# Altium PCB Pod_Islands_Panel.PcbDoc (part 2 of 10)
Units mm, origin at the board's own origin, x right, y up, seen from the top; angles counter-clockwise.
Board outline 95.7 x 83.7 mm, 6 copper layers (Top Layer, Inner1, Inner2, Inner3, Inner4, Bottom Layer), stack 0.82 mm thick; 1100 components, 940 nets, 4944 pads, 3680 vias.
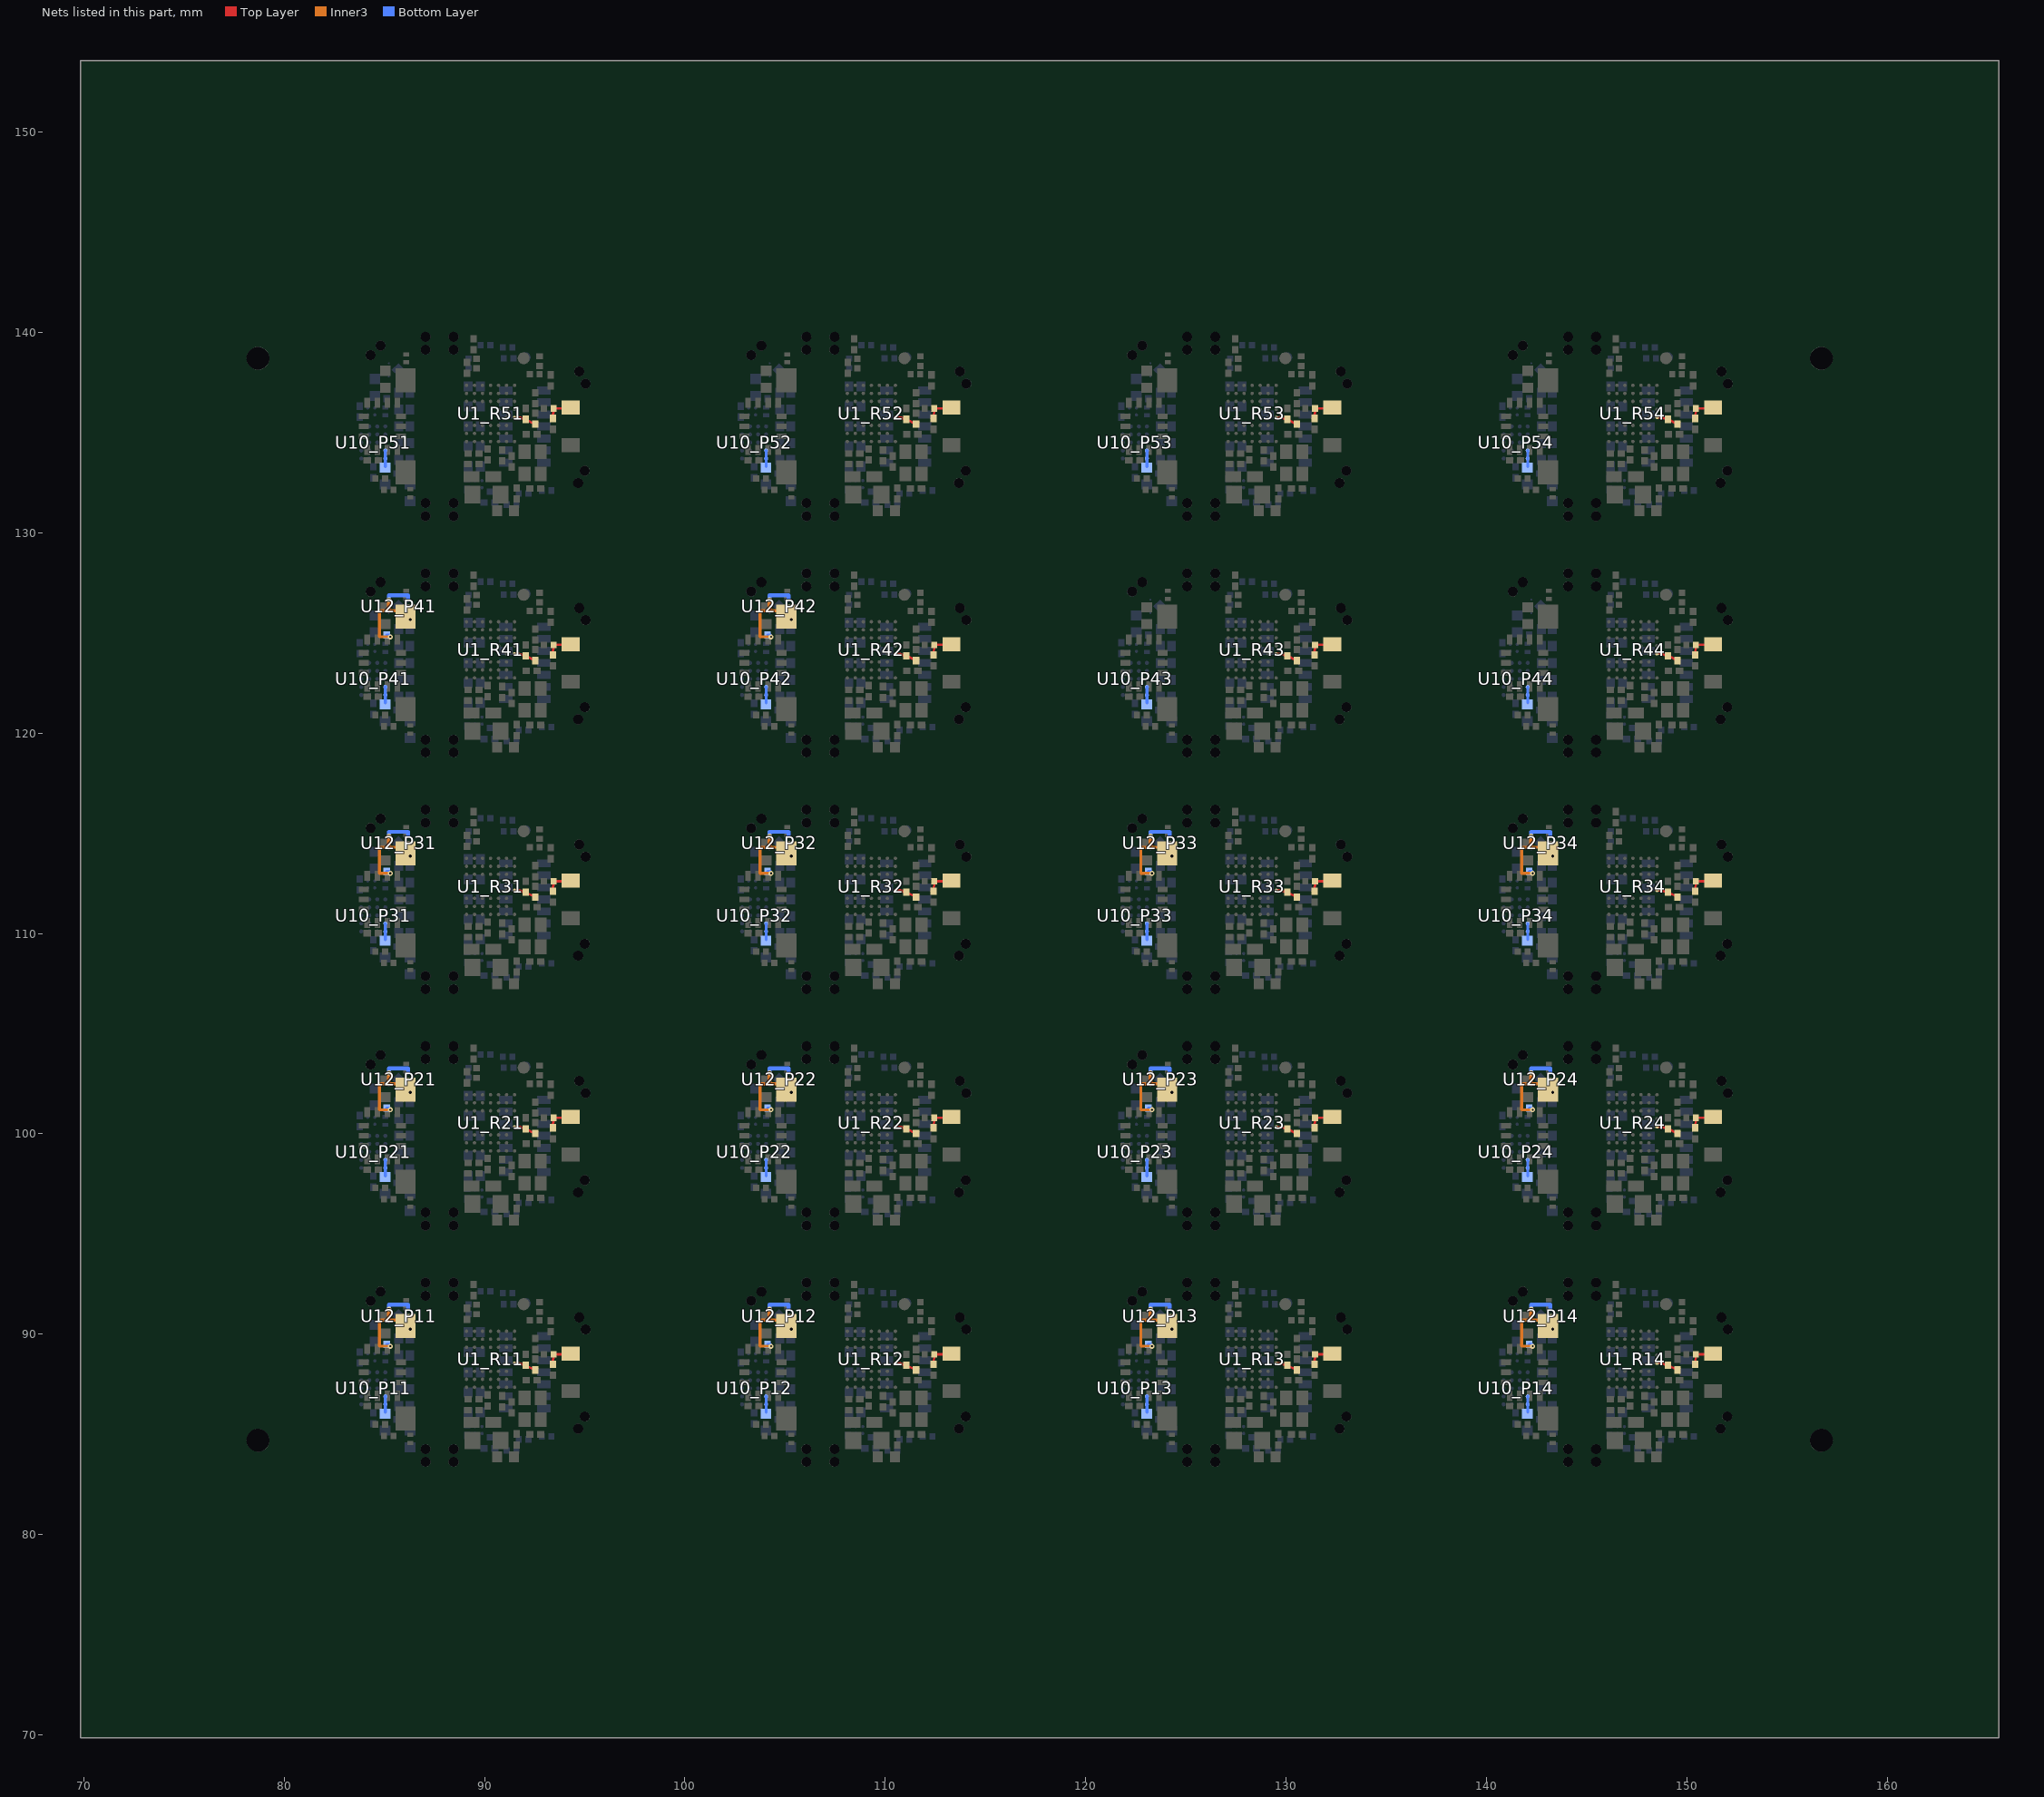
[diagram p6: the nets of this part, all layers, seen from the top]

## Components (designator, comment, footprint, x,y, rotation, side; value= is the part's Value field where it differs from the comment) (continued)
U1_R54 "NRF52832-CIAA-G-R7" WLCSP-50_L3.2-W3.0-TL_NRF52832 147.3,135.95 r180 top
U2_R11 "TPS7A0218PYCHR" WLCSP-4_L0.6-W0.6-P0.35-R2-C2-TL 89.7,85.22 r180 bottom
U2_R12 "TPS7A0218PYCHR" WLCSP-4_L0.6-W0.6-P0.35-R2-C2-TL 108.7,85.22 r180 bottom
U2_R13 "TPS7A0218PYCHR" WLCSP-4_L0.6-W0.6-P0.35-R2-C2-TL 127.7,85.22 r180 bottom
U2_R14 "TPS7A0218PYCHR" WLCSP-4_L0.6-W0.6-P0.35-R2-C2-TL 146.7,85.22 r180 bottom
U2_R21 "TPS7A0218PYCHR" WLCSP-4_L0.6-W0.6-P0.35-R2-C2-TL 89.7,97.02 r180 bottom
U2_R22 "TPS7A0218PYCHR" WLCSP-4_L0.6-W0.6-P0.35-R2-C2-TL 108.7,97.02 r180 bottom
U2_R23 "TPS7A0218PYCHR" WLCSP-4_L0.6-W0.6-P0.35-R2-C2-TL 127.7,97.02 r180 bottom
U2_R24 "TPS7A0218PYCHR" WLCSP-4_L0.6-W0.6-P0.35-R2-C2-TL 146.7,97.02 r180 bottom
U2_R31 "TPS7A0218PYCHR" WLCSP-4_L0.6-W0.6-P0.35-R2-C2-TL 89.7,108.82 r180 bottom
U2_R32 "TPS7A0218PYCHR" WLCSP-4_L0.6-W0.6-P0.35-R2-C2-TL 108.7,108.82 r180 bottom
U2_R33 "TPS7A0218PYCHR" WLCSP-4_L0.6-W0.6-P0.35-R2-C2-TL 127.7,108.82 r180 bottom
U2_R34 "TPS7A0218PYCHR" WLCSP-4_L0.6-W0.6-P0.35-R2-C2-TL 146.7,108.82 r180 bottom
U2_R41 "TPS7A0218PYCHR" WLCSP-4_L0.6-W0.6-P0.35-R2-C2-TL 89.7,120.62 r180 bottom
U2_R42 "TPS7A0218PYCHR" WLCSP-4_L0.6-W0.6-P0.35-R2-C2-TL 108.7,120.62 r180 bottom
U2_R43 "TPS7A0218PYCHR" WLCSP-4_L0.6-W0.6-P0.35-R2-C2-TL 127.7,120.62 r180 bottom
U2_R44 "TPS7A0218PYCHR" WLCSP-4_L0.6-W0.6-P0.35-R2-C2-TL 146.7,120.62 r180 bottom
U2_R51 "TPS7A0218PYCHR" WLCSP-4_L0.6-W0.6-P0.35-R2-C2-TL 89.7,132.42 r180 bottom
U2_R52 "TPS7A0218PYCHR" WLCSP-4_L0.6-W0.6-P0.35-R2-C2-TL 108.7,132.42 r180 bottom
U2_R53 "TPS7A0218PYCHR" WLCSP-4_L0.6-W0.6-P0.35-R2-C2-TL 127.7,132.42 r180 bottom
U2_R54 "TPS7A0218PYCHR" WLCSP-4_L0.6-W0.6-P0.35-R2-C2-TL 146.7,132.42 r180 bottom
U3_R11 "MAXM86161AEFD+T" OLGA-14_L4.3-W2.9-P0.60-TL 92.01,88.1 r180 bottom
U3_R12 "MAXM86161AEFD+T" OLGA-14_L4.3-W2.9-P0.60-TL 111.01,88.1 r180 bottom
U3_R13 "MAXM86161AEFD+T" OLGA-14_L4.3-W2.9-P0.60-TL 130.01,88.1 r180 bottom
U3_R14 "MAXM86161AEFD+T" OLGA-14_L4.3-W2.9-P0.60-TL 149.01,88.1 r180 bottom
U3_R21 "MAXM86161AEFD+T" OLGA-14_L4.3-W2.9-P0.60-TL 92.01,99.9 r180 bottom
U3_R22 "MAXM86161AEFD+T" OLGA-14_L4.3-W2.9-P0.60-TL 111.01,99.9 r180 bottom
U3_R23 "MAXM86161AEFD+T" OLGA-14_L4.3-W2.9-P0.60-TL 130.01,99.9 r180 bottom
U3_R24 "MAXM86161AEFD+T" OLGA-14_L4.3-W2.9-P0.60-TL 149.01,99.9 r180 bottom
U3_R31 "MAXM86161AEFD+T" OLGA-14_L4.3-W2.9-P0.60-TL 92.01,111.7 r180 bottom
U3_R32 "MAXM86161AEFD+T" OLGA-14_L4.3-W2.9-P0.60-TL 111.01,111.7 r180 bottom
U3_R33 "MAXM86161AEFD+T" OLGA-14_L4.3-W2.9-P0.60-TL 130.01,111.7 r180 bottom
U3_R34 "MAXM86161AEFD+T" OLGA-14_L4.3-W2.9-P0.60-TL 149.01,111.7 r180 bottom
U3_R41 "MAXM86161AEFD+T" OLGA-14_L4.3-W2.9-P0.60-TL 92.01,123.5 r180 bottom
U3_R42 "MAXM86161AEFD+T" OLGA-14_L4.3-W2.9-P0.60-TL 111.01,123.5 r180 bottom
U3_R43 "MAXM86161AEFD+T" OLGA-14_L4.3-W2.9-P0.60-TL 130.01,123.5 r180 bottom
U3_R44 "MAXM86161AEFD+T" OLGA-14_L4.3-W2.9-P0.60-TL 149.01,123.5 r180 bottom
U3_R51 "MAXM86161AEFD+T" OLGA-14_L4.3-W2.9-P0.60-TL 92.01,135.3 r180 bottom
U3_R52 "MAXM86161AEFD+T" OLGA-14_L4.3-W2.9-P0.60-TL 111.01,135.3 r180 bottom
U3_R53 "MAXM86161AEFD+T" OLGA-14_L4.3-W2.9-P0.60-TL 130.01,135.3 r180 bottom
U3_R54 "MAXM86161AEFD+T" OLGA-14_L4.3-W2.9-P0.60-TL 149.01,135.3 r180 bottom
U10_P11 "BQ21061YFPR" DSBGA-20_L2.0-W1.6-R4-C5-P0.40-BL-1 84.45,87.3 r270 bottom
U10_P12 "BQ21061YFPR" DSBGA-20_L2.0-W1.6-R4-C5-P0.40-BL-1 103.45,87.3 r270 bottom
U10_P13 "BQ21061YFPR" DSBGA-20_L2.0-W1.6-R4-C5-P0.40-BL-1 122.45,87.3 r270 bottom
U10_P14 "BQ21061YFPR" DSBGA-20_L2.0-W1.6-R4-C5-P0.40-BL-1 141.45,87.3 r270 bottom
U10_P21 "BQ21061YFPR" DSBGA-20_L2.0-W1.6-R4-C5-P0.40-BL-1 84.45,99.1 r270 bottom
U10_P22 "BQ21061YFPR" DSBGA-20_L2.0-W1.6-R4-C5-P0.40-BL-1 103.45,99.1 r270 bottom
U10_P23 "BQ21061YFPR" DSBGA-20_L2.0-W1.6-R4-C5-P0.40-BL-1 122.45,99.1 r270 bottom
U10_P24 "BQ21061YFPR" DSBGA-20_L2.0-W1.6-R4-C5-P0.40-BL-1 141.45,99.1 r270 bottom
U10_P31 "BQ21061YFPR" DSBGA-20_L2.0-W1.6-R4-C5-P0.40-BL-1 84.45,110.9 r270 bottom
U10_P32 "BQ21061YFPR" DSBGA-20_L2.0-W1.6-R4-C5-P0.40-BL-1 103.45,110.9 r270 bottom
U10_P33 "BQ21061YFPR" DSBGA-20_L2.0-W1.6-R4-C5-P0.40-BL-1 122.45,110.9 r270 bottom
U10_P34 "BQ21061YFPR" DSBGA-20_L2.0-W1.6-R4-C5-P0.40-BL-1 141.45,110.9 r270 bottom
U10_P41 "BQ21061YFPR" DSBGA-20_L2.0-W1.6-R4-C5-P0.40-BL-1 84.45,122.7 r270 bottom
U10_P42 "BQ21061YFPR" DSBGA-20_L2.0-W1.6-R4-C5-P0.40-BL-1 103.45,122.7 r270 bottom
U10_P43 "BQ21061YFPR" DSBGA-20_L2.0-W1.6-R4-C5-P0.40-BL-1 122.45,122.7 r270 bottom
U10_P44 "BQ21061YFPR" DSBGA-20_L2.0-W1.6-R4-C5-P0.40-BL-1 141.45,122.7 r270 bottom
U10_P51 "BQ21061YFPR" DSBGA-20_L2.0-W1.6-R4-C5-P0.40-BL-1 84.45,134.5 r270 bottom
U10_P52 "BQ21061YFPR" DSBGA-20_L2.0-W1.6-R4-C5-P0.40-BL-1 103.45,134.5 r270 bottom
U10_P53 "BQ21061YFPR" DSBGA-20_L2.0-W1.6-R4-C5-P0.40-BL-1 122.45,134.5 r270 bottom
U10_P54 "BQ21061YFPR" DSBGA-20_L2.0-W1.6-R4-C5-P0.40-BL-1 141.45,134.5 r270 bottom
U11_P11 "LSM6DSV16BXTR" LGA-14L_L3.0-W2.5-P0.50-TL 84.9,88.1 r270 top
U11_P12 "LSM6DSV16BXTR" LGA-14L_L3.0-W2.5-P0.50-TL 103.9,88.1 r270 top
U11_P13 "LSM6DSV16BXTR" LGA-14L_L3.0-W2.5-P0.50-TL 122.9,88.1 r270 top
U11_P14 "LSM6DSV16BXTR" LGA-14L_L3.0-W2.5-P0.50-TL 141.9,88.1 r270 top
U11_P21 "LSM6DSV16BXTR" LGA-14L_L3.0-W2.5-P0.50-TL 84.9,99.9 r270 top
U11_P22 "LSM6DSV16BXTR" LGA-14L_L3.0-W2.5-P0.50-TL 103.9,99.9 r270 top
U11_P23 "LSM6DSV16BXTR" LGA-14L_L3.0-W2.5-P0.50-TL 122.9,99.9 r270 top
U11_P24 "LSM6DSV16BXTR" LGA-14L_L3.0-W2.5-P0.50-TL 141.9,99.9 r270 top
U11_P31 "LSM6DSV16BXTR" LGA-14L_L3.0-W2.5-P0.50-TL 84.9,111.7 r270 top
U11_P32 "LSM6DSV16BXTR" LGA-14L_L3.0-W2.5-P0.50-TL 103.9,111.7 r270 top
U11_P33 "LSM6DSV16BXTR" LGA-14L_L3.0-W2.5-P0.50-TL 122.9,111.7 r270 top
U11_P34 "LSM6DSV16BXTR" LGA-14L_L3.0-W2.5-P0.50-TL 141.9,111.7 r270 top
U11_P41 "LSM6DSV16BXTR" LGA-14L_L3.0-W2.5-P0.50-TL 84.9,123.5 r270 top
U11_P42 "LSM6DSV16BXTR" LGA-14L_L3.0-W2.5-P0.50-TL 103.9,123.5 r270 top
U11_P43 "LSM6DSV16BXTR" LGA-14L_L3.0-W2.5-P0.50-TL 122.9,123.5 r270 top
U11_P44 "LSM6DSV16BXTR" LGA-14L_L3.0-W2.5-P0.50-TL 141.9,123.5 r270 top
U11_P51 "LSM6DSV16BXTR" LGA-14L_L3.0-W2.5-P0.50-TL 84.9,135.3 r270 top
U11_P52 "LSM6DSV16BXTR" LGA-14L_L3.0-W2.5-P0.50-TL 103.9,135.3 r270 top
U11_P53 "LSM6DSV16BXTR" LGA-14L_L3.0-W2.5-P0.50-TL 122.9,135.3 r270 top
U11_P54 "LSM6DSV16BXTR" LGA-14L_L3.0-W2.5-P0.50-TL 141.9,135.3 r270 top
U12_P11 "AP6683" DFN-4_L1.0-W1.0-P0.65-BL-EP 85.7,90.92 r90 bottom
U12_P12 "AP6683" DFN-4_L1.0-W1.0-P0.65-BL-EP 104.7,90.92 r90 bottom
U12_P13 "AP6683" DFN-4_L1.0-W1.0-P0.65-BL-EP 123.7,90.92 r90 bottom
U12_P14 "AP6683" DFN-4_L1.0-W1.0-P0.65-BL-EP 142.7,90.92 r90 bottom
U12_P21 "AP6683" DFN-4_L1.0-W1.0-P0.65-BL-EP 85.7,102.72 r90 bottom
U12_P22 "AP6683" DFN-4_L1.0-W1.0-P0.65-BL-EP 104.7,102.72 r90 bottom
U12_P23 "AP6683" DFN-4_L1.0-W1.0-P0.65-BL-EP 123.7,102.72 r90 bottom
U12_P24 "AP6683" DFN-4_L1.0-W1.0-P0.65-BL-EP 142.7,102.72 r90 bottom
U12_P31 "AP6683" DFN-4_L1.0-W1.0-P0.65-BL-EP 85.7,114.52 r90 bottom
U12_P32 "AP6683" DFN-4_L1.0-W1.0-P0.65-BL-EP 104.7,114.52 r90 bottom
U12_P33 "AP6683" DFN-4_L1.0-W1.0-P0.65-BL-EP 123.7,114.52 r90 bottom
U12_P34 "AP6683" DFN-4_L1.0-W1.0-P0.65-BL-EP 142.7,114.52 r90 bottom
U12_P41 "AP6683" DFN-4_L1.0-W1.0-P0.65-BL-EP 85.7,126.32 r90 bottom
U12_P42 "AP6683" DFN-4_L1.0-W1.0-P0.65-BL-EP 104.7,126.32 r90 bottom
U12_P43 "AP6683" DFN-4_L1.0-W1.0-P0.65-BL-EP 123.7,126.32 r90 bottom
U12_P44 "AP6683" DFN-4_L1.0-W1.0-P0.65-BL-EP 142.7,126.32 r90 bottom
U12_P51 "AP6683" DFN-4_L1.0-W1.0-P0.65-BL-EP 85.7,138.12 r90 bottom
U12_P52 "AP6683" DFN-4_L1.0-W1.0-P0.65-BL-EP 104.7,138.12 r90 bottom
U12_P53 "AP6683" DFN-4_L1.0-W1.0-P0.65-BL-EP 123.7,138.12 r90 bottom
U12_P54 "AP6683" DFN-4_L1.0-W1.0-P0.65-BL-EP 142.7,138.12 r90 bottom
U13_P11 "TPS7A0218PYCHR" WLCSP-4_L0.6-W0.6-P0.35-R2-C2-TL 84.35,88.85 r180 bottom
U13_P12 "TPS7A0218PYCHR" WLCSP-4_L0.6-W0.6-P0.35-R2-C2-TL 103.35,88.85 r180 bottom
U13_P13 "TPS7A0218PYCHR" WLCSP-4_L0.6-W0.6-P0.35-R2-C2-TL 122.35,88.85 r180 bottom
U13_P14 "TPS7A0218PYCHR" WLCSP-4_L0.6-W0.6-P0.35-R2-C2-TL 141.35,88.85 r180 bottom
U13_P21 "TPS7A0218PYCHR" WLCSP-4_L0.6-W0.6-P0.35-R2-C2-TL 84.35,100.65 r180 bottom
U13_P22 "TPS7A0218PYCHR" WLCSP-4_L0.6-W0.6-P0.35-R2-C2-TL 103.35,100.65 r180 bottom
U13_P23 "TPS7A0218PYCHR" WLCSP-4_L0.6-W0.6-P0.35-R2-C2-TL 122.35,100.65 r180 bottom
U13_P24 "TPS7A0218PYCHR" WLCSP-4_L0.6-W0.6-P0.35-R2-C2-TL 141.35,100.65 r180 bottom
U13_P31 "TPS7A0218PYCHR" WLCSP-4_L0.6-W0.6-P0.35-R2-C2-TL 84.35,112.45 r180 bottom
U13_P32 "TPS7A0218PYCHR" WLCSP-4_L0.6-W0.6-P0.35-R2-C2-TL 103.35,112.45 r180 bottom
U13_P33 "TPS7A0218PYCHR" WLCSP-4_L0.6-W0.6-P0.35-R2-C2-TL 122.35,112.45 r180 bottom
U13_P34 "TPS7A0218PYCHR" WLCSP-4_L0.6-W0.6-P0.35-R2-C2-TL 141.35,112.45 r180 bottom
U13_P41 "TPS7A0218PYCHR" WLCSP-4_L0.6-W0.6-P0.35-R2-C2-TL 84.35,124.25 r180 bottom
U13_P42 "TPS7A0218PYCHR" WLCSP-4_L0.6-W0.6-P0.35-R2-C2-TL 103.35,124.25 r180 bottom
U13_P43 "TPS7A0218PYCHR" WLCSP-4_L0.6-W0.6-P0.35-R2-C2-TL 122.35,124.25 r180 bottom
U13_P44 "TPS7A0218PYCHR" WLCSP-4_L0.6-W0.6-P0.35-R2-C2-TL 141.35,124.25 r180 bottom
U13_P51 "TPS7A0218PYCHR" WLCSP-4_L0.6-W0.6-P0.35-R2-C2-TL 84.35,136.05 r180 bottom
U13_P52 "TPS7A0218PYCHR" WLCSP-4_L0.6-W0.6-P0.35-R2-C2-TL 103.35,136.05 r180 bottom
U13_P53 "TPS7A0218PYCHR" WLCSP-4_L0.6-W0.6-P0.35-R2-C2-TL 122.35,136.05 r180 bottom
U13_P54 "TPS7A0218PYCHR" WLCSP-4_L0.6-W0.6-P0.35-R2-C2-TL 141.35,136.05 r180 bottom
Y1_R11 "-" CRYSTAL-SMD_4P-L1.6-W1.2-BL 92.4,86.28 r90 top
Y1_R12 "-" CRYSTAL-SMD_4P-L1.6-W1.2-BL 111.4,86.28 r90 top
Y1_R13 "-" CRYSTAL-SMD_4P-L1.6-W1.2-BL 130.4,86.28 r90 top
Y1_R14 "-" CRYSTAL-SMD_4P-L1.6-W1.2-BL 149.4,86.28 r90 top
Y1_R21 "-" CRYSTAL-SMD_4P-L1.6-W1.2-BL 92.4,98.08 r90 top
Y1_R22 "-" CRYSTAL-SMD_4P-L1.6-W1.2-BL 111.4,98.08 r90 top
Y1_R23 "-" CRYSTAL-SMD_4P-L1.6-W1.2-BL 130.4,98.08 r90 top
Y1_R24 "-" CRYSTAL-SMD_4P-L1.6-W1.2-BL 149.4,98.08 r90 top
Y1_R31 "-" CRYSTAL-SMD_4P-L1.6-W1.2-BL 92.4,109.88 r90 top
Y1_R32 "-" CRYSTAL-SMD_4P-L1.6-W1.2-BL 111.4,109.88 r90 top
Y1_R33 "-" CRYSTAL-SMD_4P-L1.6-W1.2-BL 130.4,109.88 r90 top
Y1_R34 "-" CRYSTAL-SMD_4P-L1.6-W1.2-BL 149.4,109.88 r90 top
Y1_R41 "-" CRYSTAL-SMD_4P-L1.6-W1.2-BL 92.4,121.68 r90 top
Y1_R42 "-" CRYSTAL-SMD_4P-L1.6-W1.2-BL 111.4,121.68 r90 top
Y1_R43 "-" CRYSTAL-SMD_4P-L1.6-W1.2-BL 130.4,121.68 r90 top
Y1_R44 "-" CRYSTAL-SMD_4P-L1.6-W1.2-BL 149.4,121.68 r90 top
Y1_R51 "-" CRYSTAL-SMD_4P-L1.6-W1.2-BL 92.4,133.48 r90 top
Y1_R52 "-" CRYSTAL-SMD_4P-L1.6-W1.2-BL 111.4,133.48 r90 top
Y1_R53 "-" CRYSTAL-SMD_4P-L1.6-W1.2-BL 130.4,133.48 r90 top
Y1_R54 "-" CRYSTAL-SMD_4P-L1.6-W1.2-BL 149.4,133.48 r90 top
Z41_R11 "0Ω" R0201 93.2,89 r0 top
Z41_R12 "0Ω" R0201 112.2,89 r0 top
Z41_R13 "0Ω" R0201 131.2,89 r0 top
Z41_R14 "0Ω" R0201 150.2,89 r0 top
Z41_R21 "0Ω" R0201 93.2,100.8 r0 top
Z41_R22 "0Ω" R0201 112.2,100.8 r0 top
Z41_R23 "0Ω" R0201 131.2,100.8 r0 top
Z41_R24 "0Ω" R0201 150.2,100.8 r0 top
Z41_R31 "0Ω" R0201 93.2,112.6 r0 top
Z41_R32 "0Ω" R0201 112.2,112.6 r0 top
Z41_R33 "0Ω" R0201 131.2,112.6 r0 top
Z41_R34 "0Ω" R0201 150.2,112.6 r0 top
Z41_R41 "0Ω" R0201 93.2,124.4 r0 top
Z41_R42 "0Ω" R0201 112.2,124.4 r0 top
Z41_R43 "0Ω" R0201 131.2,124.4 r0 top
Z41_R44 "0Ω" R0201 150.2,124.4 r0 top
Z41_R51 "0Ω" R0201 93.2,136.2 r0 top
Z41_R52 "0Ω" R0201 112.2,136.2 r0 top
Z41_R53 "0Ω" R0201 131.2,136.2 r0 top
Z41_R54 "0Ω" R0201 150.2,136.2 r0 top

## Footprints (in the part's own frame and the unit in brackets; to place one, negate y for a bottom-side part, rotate by r counter-clockwise, add the part's x,y. Pads: shape width x height; smd on the part's side, far side on the other; paste and mask are expansions set on the pad)
ANT-SMD_L1.7-W0.9 [mm]
  rect 0.7x0.9 smd paste+0 mask+0.051: 1(-0.937,0) 2(0.937,0)
  silkscreen extent 1.4,-0.1 1.6,0.1
C0201 [mm]
  rect 0.368x0.324 smd paste-100 mask+0.051: 1(-0.274,0) 2(0.274,0)
C0402 [mm]
  rect 0.5x0.54 smd paste+0 mask+0.051: 1(-0.42,0) 2(0.42,0)
CRYSTAL-SMD_4P-L1.6-W1.2-BL [mm]
  rect 0.73x0.6 smd paste+0 mask+0.05: 1(-0.55,-0.4) 2(0.55,-0.4) 3(0.55,0.4) 4(-0.55,0.4)
  silkscreen extent -1.27,-1.05 -1.07,-0.85
DFN-4_L1.0-W1.0-P0.65-BL-EP [mm]
  round 0.092 smd: 1(-0.333,-0.475) 2(0.333,-0.474) 3(0.333,0.475) 4(-0.333,0.475)
  rect 0.48x0.48 smd rot 45: 5(0.004,0.001)
  Top Layer region: 0.425,-0.649 0.225,-0.649 0.225,-0.399 0.225,-0.399 0.375,-0.249 0.425,-0.249
  Top Layer region: -0.225,-0.4 -0.225,-0.65 -0.425,-0.65 -0.425,-0.25 -0.375,-0.25
  Top Layer region: -0.425,0.651 -0.225,0.651 -0.225,0.401 -0.225,0.401 -0.375,0.251 -0.425,0.251
  Top Layer region: 0.425,0.651 0.225,0.651 0.225,0.401 0.225,0.401 0.375,0.251 0.425,0.251
  silkscreen extent -0.78,-1.06 -0.58,-0.85
DSBGA-20_L2.0-W1.6-R4-C5-P0.40-BL-1 [mm]
  round 0.2 smd paste-100 mask+0.051: A1(-0.8,-0.6) A2(-0.8,-0.2) A3(-0.8,0.2) A4(-0.8,0.6) B1(-0.4,-0.6) B2(-0.4,-0.2) B3(-0.4,0.2) B4(-0.4,0.6) C1(0,-0.6) C2(0,-0.2) C3(0,0.2) C4(0,0.6) D1(0.4,-0.6) D2(0.4,-0.2) D3(0.4,0.2) D4(0.4,0.6) E1(0.8,-0.6) E2(0.8,-0.2) E3(0.8,0.2) E4(0.8,0.6)
  silkscreen extent -1.26,-1.06 -1.05,-0.85
L0201-RD [mm]
  rect 0.368x0.324 smd paste-100 mask+0.051: 1(-0.274,0) 2(0.274,0)
L0402-R-RD [mm]
  rect 0.79x0.54 smd paste-100 mask+0.051: 1(-0.545,0) 2(0.545,0)
L0603 [mm]
  rect 0.8x0.864 smd paste-100 mask+0.051: 1(-0.7,0) 2(0.7,0)
LGA-14L_L3.0-W2.5-P0.50-TL [mm]
  rect 0.5x0.28 smd: 1(-1.175,0.75) 2(-1.175,0.25) 3(-1.175,-0.25) 4(-1.175,-0.75) 8(1.175,-0.75) 9(1.175,-0.25) 10(1.175,0.25) 11(1.175,0.75)
  rect 0.28x0.5 smd: 5(-0.5,-0.925) 6(0,-0.925) 7(0.5,-0.925) 12(0.5,0.925) 13(0,0.925) 14(-0.5,0.925)
  silkscreen extent -1.78,1.22 -1.58,1.42
OLGA-14_L4.3-W2.9-P0.60-TL [mm]
  rect 0.66x0.4 smd: 1(-0.95,1.8) 2(-0.95,1.2) 3(-0.95,0.6) 4(-0.95,0) 5(-0.95,-0.6) 6(-0.95,-1.2) 7(-0.95,-1.8) 8(0.95,-1.8) 9(0.95,-1.2) 10(0.95,-0.6) 11(0.95,0) 12(0.95,0.6) 13(0.95,1.2) 14(0.95,1.8)
  silkscreen extent -1.64,2.15 -1.43,2.36
R0201 [mm]
  rect 0.303x0.324 smd paste-100 mask+0.051: 1(-0.242,0) 2(0.242,0)
WLCSP-4_L0.6-W0.6-P0.35-R2-C2-TL [mm]
  round 0.158 smd paste-100 mask+0.05: A1(-0.175,0.175) A2(0.175,0.175) B1(-0.175,-0.175) B2(0.175,-0.175)
  silkscreen extent -0.61,0.41 -0.41,0.61
WLCSP-50_L3.2-W3.0-TL_NRF52832 [mm]
  round 0.17 smd paste-100 mask+0.051: A1(-1.2,1.4) A2(-0.8,1.4) A3(-0.4,1.4) A4(0,1.4) A5(0.4,1.4) A6(0.8,1.4) A7(1.2,1.4) B2(-0.8,1) B3(-0.4,1) B4(0,1) B5(0.4,1) B6(0.8,1) B7(1.2,1) C2(-0.8,0.6) C3(-0.4,0.6) C4(0,0.6) C5(0.4,0.6) C6(0.8,0.6) C7(1.2,0.6) D1(-1.2,0.2) D2(-0.8,0.2) D3(-0.4,0.2) D6(0.8,0.2) D7(1.2,0.2) E1(-1.2,-0.2) E2(-0.8,-0.2) E3(-0.4,-0.2) E6(0.8,-0.2) E7(1.2,-0.2) F1(-1.2,-0.6) F2(-0.8,-0.6) F3(-0.4,-0.6) F4(0,-0.6) F5(0.4,-0.6) F6(0.8,-0.6) F7(1.2,-0.6) G1(-1.2,-1) G2(-0.8,-1) G3(-0.4,-1) G4(0,-1) G5(0.4,-1) G6(0.8,-1) G7(1.2,-1) H1(-1.2,-1.4) H2(-0.8,-1.4) H3(-0.4,-1.4) H4(0,-1.4) H5(0.4,-1.4) H6(0.8,-1.4) H7(1.2,-1.4)
  silkscreen extent -1.64,1.64 -1.44,1.84
X3-DFN0603-2_L0.6-W0.3-RD [mm]
  rect 0.2x0.3 smd: 1(-0.2,0) 2(0.2,0)
  silkscreen extent -0.66,-0.1 -0.45,0.1

## Free pads (board coordinates)
  rect 1.001x1.199 smd paste+0 mask+0.051: BT1(86.058,85.8) BT1(86.058,97.601) BT1(86.058,109.4) BT1(86.058,121.2) BT1(86.058,133.001) BT1(105.06,85.8) BT1(105.06,97.601) BT1(105.06,109.4) BT1(105.06,121.2) BT1(105.06,133.001) BT1(124.059,85.8) BT1(124.059,97.601) BT1(124.059,109.4) BT1(124.059,121.2) BT1(124.059,133.001) BT1(143.058,85.8) BT1(143.058,97.601) BT1(143.058,109.4) BT1(143.058,121.2) BT1(143.058,133.001) BT2(86.058,90.4) BT2(86.058,102.201) BT2(86.058,113.999) BT2(86.058,125.8) BT2(86.058,137.601) BT2(105.06,90.4) BT2(105.06,102.201) BT2(105.06,113.999) BT2(105.06,125.8) BT2(105.06,137.601) BT2(124.059,90.4) BT2(124.059,102.201) BT2(124.059,113.999) BT2(124.059,125.8) BT2(124.059,137.601) BT2(143.058,90.4) BT2(143.058,102.201) BT2(143.058,113.999) BT2(143.058,125.8) BT2(143.058,137.601)
  rect 0.45x0.5 smd far side paste+0 mask+0: JP1(86.274,86.42) JP1(86.274,98.221) JP1(86.274,110.019) JP1(86.274,121.82) JP1(86.274,133.621) JP1(105.276,86.42) JP1(105.276,98.221) JP1(105.276,110.019) JP1(105.276,121.82) JP1(105.276,133.621) JP1(124.275,86.42) JP1(124.275,98.221) JP1(124.275,110.019) JP1(124.275,121.82) JP1(124.275,133.621) JP1(143.274,86.42) JP1(143.274,98.221) JP1(143.274,110.019) JP1(143.274,121.82) JP1(143.274,133.621) JP2(86.274,87.261) JP2(86.274,99.062) JP2(86.274,110.86) JP2(86.274,122.661) JP2(86.274,134.462) JP2(105.276,87.261) JP2(105.276,99.062) JP2(105.276,110.86) JP2(105.276,122.661) JP2(105.276,134.462) JP2(124.275,87.261) JP2(124.275,99.062) JP2(124.275,110.86) JP2(124.275,122.661) JP2(124.275,134.462) JP2(143.274,87.261) JP2(143.274,99.062) JP2(143.274,110.86) JP2(143.274,122.661) JP2(143.274,134.462) JP3(86.274,88.099) JP3(86.274,99.9) JP3(86.274,111.698) JP3(86.274,123.499) JP3(86.274,135.3) JP3(105.276,88.099) JP3(105.276,99.9) JP3(105.276,111.698) JP3(105.276,123.499) JP3(105.276,135.3) JP3(124.275,88.099) JP3(124.275,99.9) JP3(124.275,111.698) JP3(124.275,123.499) JP3(124.275,135.3) JP3(143.274,88.099) JP3(143.274,99.9) JP3(143.274,111.698) JP3(143.274,123.499) JP3(143.274,135.3) JP4(86.274,88.94) JP4(86.274,100.741) JP4(86.274,112.539) JP4(86.274,124.34) JP4(86.274,136.141) JP4(105.276,88.94) JP4(105.276,100.741) JP4(105.276,112.539) JP4(105.276,124.34) JP4(105.276,136.141) JP4(124.275,88.94) JP4(124.275,100.741) JP4(124.275,112.539) JP4(124.275,124.34) JP4(124.275,136.141) JP4(143.274,88.94) JP4(143.274,100.741) JP4(143.274,112.539) JP4(143.274,124.34) JP4(143.274,136.141) JP5(86.274,89.781) JP5(86.274,101.581) JP5(86.274,113.38) JP5(86.274,125.181) JP5(86.274,136.981) JP5(105.276,89.781) JP5(105.276,101.581) JP5(105.276,113.38) JP5(105.276,125.181) JP5(105.276,136.981) JP5(124.275,89.781) JP5(124.275,101.581) JP5(124.275,113.38) JP5(124.275,125.181) JP5(124.275,136.981) JP5(143.274,89.781) JP5(143.274,101.581) JP5(143.274,113.38) JP5(143.274,125.181) JP5(143.274,136.981) JP6(85.723,86.42) JP6(85.723,98.221) JP6(85.723,110.019) JP6(85.723,121.82) JP6(85.723,133.621) JP6(104.725,86.42) JP6(104.725,98.221) JP6(104.725,110.019) JP6(104.725,121.82) JP6(104.725,133.621) JP6(123.724,86.42) JP6(123.724,98.221) JP6(123.724,110.019) JP6(123.724,121.82) JP6(123.724,133.621) JP6(142.723,86.42) JP6(142.723,98.221) JP6(142.723,110.019) JP6(142.723,121.82) JP6(142.723,133.621) JP7(85.723,87.261) JP7(85.723,99.062) JP7(85.723,110.86) JP7(85.723,122.661) JP7(85.723,134.462) JP7(104.725,87.261) JP7(104.725,99.062) JP7(104.725,110.86) JP7(104.725,122.661) JP7(104.725,134.462) JP7(123.724,87.261) JP7(123.724,99.062) JP7(123.724,110.86) JP7(123.724,122.661) JP7(123.724,134.462) JP7(142.723,87.261) JP7(142.723,99.062) JP7(142.723,110.86) JP7(142.723,122.661) JP7(142.723,134.462) JP8(85.723,88.099) JP8(85.723,99.9) JP8(85.723,111.698) JP8(85.723,123.499) JP8(85.723,135.3) JP8(104.725,88.099) JP8(104.725,99.9) JP8(104.725,111.698) JP8(104.725,123.499) JP8(104.725,135.3) JP8(123.724,88.099) JP8(123.724,99.9) JP8(123.724,111.698) JP8(123.724,123.499) JP8(123.724,135.3) JP8(142.723,88.099) JP8(142.723,99.9) JP8(142.723,111.698) JP8(142.723,123.499) JP8(142.723,135.3) JP9(85.723,88.94) JP9(85.723,100.741) JP9(85.723,112.539) JP9(85.723,124.34) JP9(85.723,136.141) JP9(104.725,88.94) JP9(104.725,100.741) JP9(104.725,112.539) JP9(104.725,124.34) JP9(104.725,136.141) JP9(123.724,88.94) JP9(123.724,100.741) JP9(123.724,112.539) JP9(123.724,124.34) JP9(123.724,136.141) JP9(142.723,88.94) JP9(142.723,100.741) JP9(142.723,112.539) JP9(142.723,124.34) JP9(142.723,136.141) JP10(85.723,89.781) JP10(85.723,101.581) JP10(85.723,113.38) JP10(85.723,125.181) JP10(85.723,136.981) JP10(104.725,89.781) JP10(104.725,101.581) JP10(104.725,113.38) JP10(104.725,125.181) JP10(104.725,136.981) JP10(123.724,89.781) JP10(123.724,101.581) JP10(123.724,113.38) JP10(123.724,125.181) JP10(123.724,136.981) JP10(142.723,89.781) JP10(142.723,101.581) JP10(142.723,113.38) JP10(142.723,125.181) JP10(142.723,136.981)
  rect 0.45x0.5 smd far side paste+0 mask+0.051: JR1(89.185,86.1) JR1(89.185,97.901) JR1(89.185,109.699) JR1(89.185,121.5) JR1(89.185,133.301) JR1(108.184,86.1) JR1(108.184,97.901) JR1(108.184,109.699) JR1(108.184,121.5) JR1(108.184,133.301) JR1(127.186,86.1) JR1(127.186,97.901) JR1(127.186,109.699) JR1(127.186,121.5) JR1(127.186,133.301) JR1(146.185,86.1) JR1(146.185,97.901) JR1(146.185,109.699) JR1(146.185,121.5) JR1(146.185,133.301) JR2(89.185,87.101) JR2(89.185,98.902) JR2(89.185,110.7) JR2(89.185,122.501) JR2(89.185,134.302) JR2(108.184,87.101) JR2(108.184,98.902) JR2(108.184,110.7) JR2(108.184,122.501) JR2(108.184,134.302) JR2(127.186,87.101) JR2(127.186,98.902) JR2(127.186,110.7) JR2(127.186,122.501) JR2(127.186,134.302) JR2(146.185,87.101) JR2(146.185,98.902) JR2(146.185,110.7) JR2(146.185,122.501) JR2(146.185,134.302) JR3(89.185,88.099) JR3(89.185,99.9) JR3(89.185,111.698) JR3(89.185,123.499) JR3(89.185,135.3) JR3(108.184,88.099) JR3(108.184,99.9) JR3(108.184,111.698) JR3(108.184,123.499) JR3(108.184,135.3) JR3(127.186,88.099) JR3(127.186,99.9) JR3(127.186,111.698) JR3(127.186,123.499) JR3(127.186,135.3) JR3(146.185,88.099) JR3(146.185,99.9) JR3(146.185,111.698) JR3(146.185,123.499) JR3(146.185,135.3) JR4(89.185,89.1) JR4(89.185,100.901) JR4(89.185,112.699) JR4(89.185,124.5) JR4(89.185,136.301) JR4(108.184,89.1) JR4(108.184,100.901) JR4(108.184,112.699) JR4(108.184,124.5) JR4(108.184,136.301) JR4(127.186,89.1) JR4(127.186,100.901) JR4(127.186,112.699) JR4(127.186,124.5) JR4(127.186,136.301) JR4(146.185,89.1) JR4(146.185,100.901) JR4(146.185,112.699) JR4(146.185,124.5) JR4(146.185,136.301) JR5(89.185,90.101) JR5(89.185,101.901) JR5(89.185,113.7) JR5(89.185,125.501) JR5(89.185,137.301) JR5(108.184,90.101) JR5(108.184,101.901) JR5(108.184,113.7) JR5(108.184,125.501) JR5(108.184,137.301) JR5(127.186,90.101) JR5(127.186,101.901) JR5(127.186,113.7) JR5(127.186,125.501) JR5(127.186,137.301) JR5(146.185,90.101) JR5(146.185,101.901) JR5(146.185,113.7) JR5(146.185,125.501) JR5(146.185,137.301) JR6(89.784,86.1) JR6(89.784,97.901) JR6(89.784,109.699) JR6(89.784,121.5) JR6(89.784,133.301) JR6(108.784,86.1) JR6(108.784,97.901) JR6(108.784,109.699) JR6(108.784,121.5) JR6(108.784,133.301) JR6(127.785,86.1) JR6(127.785,97.901) JR6(127.785,109.699) JR6(127.785,121.5) JR6(127.785,133.301) JR6(146.785,86.1) JR6(146.785,97.901) JR6(146.785,109.699) JR6(146.785,121.5) JR6(146.785,133.301) JR7(89.784,87.101) JR7(89.784,98.902) JR7(89.784,110.7) JR7(89.784,122.501) JR7(89.784,134.302) JR7(108.784,87.101) JR7(108.784,98.902) JR7(108.784,110.7) JR7(108.784,122.501) JR7(108.784,134.302) JR7(127.785,87.101) JR7(127.785,98.902) JR7(127.785,110.7) JR7(127.785,122.501) JR7(127.785,134.302) JR7(146.785,87.101) JR7(146.785,98.902) JR7(146.785,110.7) JR7(146.785,122.501) JR7(146.785,134.302) JR8(89.784,88.099) JR8(89.784,99.9) JR8(89.784,111.698) JR8(89.784,123.499) JR8(89.784,135.3) JR8(108.784,88.099) JR8(108.784,99.9) JR8(108.784,111.698) JR8(108.784,123.499) JR8(108.784,135.3) JR8(127.785,88.099) JR8(127.785,99.9) JR8(127.785,111.698) JR8(127.785,123.499) JR8(127.785,135.3) JR8(146.785,88.099) JR8(146.785,99.9) JR8(146.785,111.698) JR8(146.785,123.499) JR8(146.785,135.3) JR9(89.784,89.1) JR9(89.784,100.901) JR9(89.784,112.699) JR9(89.784,124.5) JR9(89.784,136.301) JR9(108.784,89.1) JR9(108.784,100.901) JR9(108.784,112.699) JR9(108.784,124.5) JR9(108.784,136.301) JR9(127.785,89.1) JR9(127.785,100.901) JR9(127.785,112.699) JR9(127.785,124.5) JR9(127.785,136.301) JR9(146.785,89.1) JR9(146.785,100.901) JR9(146.785,112.699) JR9(146.785,124.5) JR9(146.785,136.301) JR10(89.784,90.101) JR10(89.784,101.901) JR10(89.784,113.7) JR10(89.784,125.501) JR10(89.784,137.301) JR10(108.784,90.101) JR10(108.784,101.901) JR10(108.784,113.7) JR10(108.784,125.501) JR10(108.784,137.301) JR10(127.785,90.101) JR10(127.785,101.901) JR10(127.785,113.7) JR10(127.785,125.501) JR10(127.785,137.301) JR10(146.785,90.101) JR10(146.785,101.901) JR10(146.785,113.7) JR10(146.785,125.501) JR10(146.785,137.301)
  round 0.5 hole 0.5 unplated: MB1(87.06,83.625) MB2(87.06,84.275) MB3(88.46,83.625) MB4(88.46,84.275) MB5(87.06,91.925) MB6(87.06,92.575) MB7(88.46,91.925) MB8(88.46,92.575) MB9(84.813,92.13) MB10(84.309,91.66) MB11(94.671,85.283) MB12(95.005,85.886) MB13(95.043,90.232) MB14(94.719,90.84) MB15(87.06,95.425) MB16(87.06,96.075) MB17(88.46,95.425) MB18(88.46,96.075) MB19(87.06,103.725) MB20(87.06,104.375) MB21(88.46,103.725) MB22(88.46,104.375) MB23(84.813,103.93) MB24(84.309,103.46) MB25(94.671,97.083) MB26(95.005,97.686) MB27(95.043,102.032) MB28(94.719,102.64) MB29(87.06,107.225) MB30(87.06,107.875) MB31(88.46,107.225) MB32(88.46,107.875) MB33(87.06,115.525) MB34(87.06,116.175) MB35(88.46,115.525) MB36(88.46,116.175) MB37(84.813,115.73) MB38(84.309,115.26) MB39(94.671,108.883) MB40(95.005,109.486) MB41(95.043,113.832) MB42(94.719,114.44) MB43(87.06,119.025) MB44(87.06,119.675) MB45(88.46,119.025) MB46(88.46,119.675) MB47(87.06,127.325) MB48(87.06,127.975) MB49(88.46,127.325) MB50(88.46,127.975) MB51(84.813,127.53) MB52(84.309,127.06) MB53(94.671,120.683) MB54(95.005,121.286) MB55(95.043,125.632) MB56(94.719,126.24) MB57(87.06,130.825) MB58(87.06,131.475) MB59(88.46,130.825) MB60(88.46,131.475) MB61(87.06,139.125) MB62(87.06,139.775) MB63(88.46,139.125) MB64(88.46,139.775) MB65(84.813,139.33) MB66(84.309,138.86) MB67(94.671,132.483) MB68(95.005,133.086) MB69(95.043,137.432) MB70(94.719,138.04) MB71(106.06,83.625) MB72(106.06,84.275) MB73(107.46,83.625) MB74(107.46,84.275) MB75(106.06,91.925) MB76(106.06,92.575) MB77(107.46,91.925) MB78(107.46,92.575) MB79(103.813,92.13) MB80(103.309,91.66) MB81(113.671,85.283) MB82(114.005,85.886) MB83(114.043,90.232) MB84(113.719,90.84) MB85(106.06,95.425) MB86(106.06,96.075) MB87(107.46,95.425) MB88(107.46,96.075) MB89(106.06,103.725) MB90(106.06,104.375) MB91(107.46,103.725) MB92(107.46,104.375) MB93(103.813,103.93) MB94(103.309,103.46) MB95(113.671,97.083) MB96(114.005,97.686) MB97(114.043,102.032) MB98(113.719,102.64) MB99(106.06,107.225) MB100(106.06,107.875) MB101(107.46,107.225) MB102(107.46,107.875) MB103(106.06,115.525) MB104(106.06,116.175) MB105(107.46,115.525) MB106(107.46,116.175) MB107(103.813,115.73) MB108(103.309,115.26) MB109(113.671,108.883) MB110(114.005,109.486) MB111(114.043,113.832) MB112(113.719,114.44) MB113(106.06,119.025) MB114(106.06,119.675) MB115(107.46,119.025) MB116(107.46,119.675) MB117(106.06,127.325) MB118(106.06,127.975) MB119(107.46,127.325) MB120(107.46,127.975) MB121(103.813,127.53) MB122(103.309,127.06) MB123(113.671,120.683) MB124(114.005,121.286) MB125(114.043,125.632) MB126(113.719,126.24) MB127(106.06,130.825) MB128(106.06,131.475) MB129(107.46,130.825) MB130(107.46,131.475) MB131(106.06,139.125) MB132(106.06,139.775) MB133(107.46,139.125) MB134(107.46,139.775) MB135(103.813,139.33) MB136(103.309,138.86) MB137(113.671,132.483) MB138(114.005,133.086) MB139(114.043,137.432) MB140(113.719,138.04) MB141(125.06,83.625) MB142(125.06,84.275) MB143(126.46,83.625) MB144(126.46,84.275) MB145(125.06,91.925) MB146(125.06,92.575) MB147(126.46,91.925) MB148(126.46,92.575) MB149(122.813,92.13) MB150(122.309,91.66) MB151(132.671,85.283) MB152(133.005,85.886) MB153(133.043,90.232) MB154(132.719,90.84) MB155(125.06,95.425) MB156(125.06,96.075) MB157(126.46,95.425) MB158(126.46,96.075) MB159(125.06,103.725) MB160(125.06,104.375) MB161(126.46,103.725) MB162(126.46,104.375) MB163(122.813,103.93) MB164(122.309,103.46) MB165(132.671,97.083) MB166(133.005,97.686) MB167(133.043,102.032) MB168(132.719,102.64) MB169(125.06,107.225) MB170(125.06,107.875) MB171(126.46,107.225) MB172(126.46,107.875) MB173(125.06,115.525) MB174(125.06,116.175) MB175(126.46,115.525) MB176(126.46,116.175) MB177(122.813,115.73) MB178(122.309,115.26) MB179(132.671,108.883) MB180(133.005,109.486) MB181(133.043,113.832) MB182(132.719,114.44) MB183(125.06,119.025) MB184(125.06,119.675) MB185(126.46,119.025) MB186(126.46,119.675) MB187(125.06,127.325) MB188(125.06,127.975) MB189(126.46,127.325) MB190(126.46,127.975) MB191(122.813,127.53) MB192(122.309,127.06) MB193(132.671,120.683) MB194(133.005,121.286) MB195(133.043,125.632) MB196(132.719,126.24) MB197(125.06,130.825) MB198(125.06,131.475) MB199(126.46,130.825) MB200(126.46,131.475) MB201(125.06,139.125) MB202(125.06,139.775) MB203(126.46,139.125) MB204(126.46,139.775) MB205(122.813,139.33) MB206(122.309,138.86) MB207(132.671,132.483) MB208(133.005,133.086) MB209(133.043,137.432) MB210(132.719,138.04) MB211(144.06,83.625) MB212(144.06,84.275) MB213(145.46,83.625) MB214(145.46,84.275) MB215(144.06,91.925) MB216(144.06,92.575) MB217(145.46,91.925) MB218(145.46,92.575) MB219(141.813,92.13) MB220(141.309,91.66) MB221(151.671,85.283) MB222(152.005,85.886) MB223(152.043,90.232) MB224(151.719,90.84) MB225(144.06,95.425) MB226(144.06,96.075) MB227(145.46,95.425) MB228(145.46,96.075) MB229(144.06,103.725) MB230(144.06,104.375) MB231(145.46,103.725) MB232(145.46,104.375) MB233(141.813,103.93) MB234(141.309,103.46) MB235(151.671,97.083) MB236(152.005,97.686) MB237(152.043,102.032) MB238(151.719,102.64) MB239(144.06,107.225) MB240(144.06,107.875) MB241(145.46,107.225) MB242(145.46,107.875) MB243(144.06,115.525) MB244(144.06,116.175) MB245(145.46,115.525) MB246(145.46,116.175) MB247(141.813,115.73) MB248(141.309,115.26) MB249(151.671,108.883) MB250(152.005,109.486) MB251(152.043,113.832) MB252(151.719,114.44) MB253(144.06,119.025) MB254(144.06,119.675) MB255(145.46,119.025) MB256(145.46,119.675) MB257(144.06,127.325) MB258(144.06,127.975) MB259(145.46,127.325) MB260(145.46,127.975) MB261(141.813,127.53) MB262(141.309,127.06) MB263(151.671,120.683) MB264(152.005,121.286) MB265(152.043,125.632) MB266(151.719,126.24) MB267(144.06,130.825) MB268(144.06,131.475) MB269(145.46,130.825) MB270(145.46,131.475) MB271(144.06,139.125) MB272(144.06,139.775) MB273(145.46,139.125) MB274(145.46,139.775) MB275(141.813,139.33) MB276(141.309,138.86) MB277(151.671,132.483) MB278(152.005,133.086) MB279(152.043,137.432) MB280(151.719,138.04)
  round 1.152 hole 1.152 unplated: TH1(78.7,84.7) TH2(156.7,84.7) TH3(78.7,138.7) TH4(156.7,138.7)
  round 0.599 smd paste+0 mask+0.051: TP1(91.951,91.5) TP1(91.951,103.301) TP1(91.951,115.099) TP1(91.951,126.9) TP1(91.951,138.701) TP1(110.95,91.5) TP1(110.95,103.301) TP1(110.95,115.099) TP1(110.95,126.9) TP1(110.95,138.701) TP1(129.952,91.5) TP1(129.952,103.301) TP1(129.952,115.099) TP1(129.952,126.9) TP1(129.952,138.701) TP1(148.951,91.5) TP1(148.951,103.301) TP1(148.951,115.099) TP1(148.951,126.9) TP1(148.951,138.701)
  round 0.5 smd far side paste+0 mask+0.051: TP2(92.05,91.551) TP2(92.05,103.352) TP2(92.05,115.15) TP2(92.05,126.951) TP2(92.05,138.752) TP2(111.049,91.551) TP2(111.049,103.352) TP2(111.049,115.15) TP2(111.049,126.951) TP2(111.049,138.752) TP2(130.051,91.551) TP2(130.051,103.352) TP2(130.051,115.15) TP2(130.051,126.951) TP2(130.051,138.752) TP2(149.05,91.551) TP2(149.05,103.352) TP2(149.05,115.15) TP2(149.05,126.951) TP2(149.05,138.752)

## Via types
v1: diameter 0.249, hole 0.102, Top Layer to Inner1, 920 vias
v2: diameter 0.249, hole 0.102, Inner1 to Bottom Layer, 740 vias
v3: diameter 0.249, hole 0.102, Top Layer to Inner4, 580 vias
v4: diameter 0.249, hole 0.152, Top Layer to Bottom Layer, 540 vias
v5: diameter 0.249, hole 0.102, Inner4 to Bottom Layer, 520 vias
v6: diameter 0.3, hole 0.152, Inner1 to Inner4, 380 vias

## Nets (pads, with @x,y where several pads share a name; then routed paths per layer and width w, separated by ;. In a path a pad name is that pad's centre, name@x,y a point inside that pad or via, vN(x,y) a via of type N, cw(c..) or ccw(c..) an arc to the next point about the centre after c; other vN are vias at no path point)
ANT_FEED_R11: ANT1_R11.2 C40_R11.1 Z41_R11.2 | length 1.4
  Top Layer w0.124: C40_R11.1@93.411,88.503 93.442,89.001 ANT1_R11.2@94.301,89.001
ANT_FEED_R12: ANT1_R12.2 C40_R12.1 Z41_R12.2 | length 1.4
  Top Layer w0.124: C40_R12.1@112.412,88.503 112.442,89.001 ANT1_R12.2@113.301,89.001
ANT_FEED_R13: ANT1_R13.2 C40_R13.1 Z41_R13.2 | length 1.4
  Top Layer w0.124: C40_R13.1@131.411,88.503 131.442,89.001 ANT1_R13.2@132.301,89.001
ANT_FEED_R14: ANT1_R14.2 C40_R14.1 Z41_R14.2 | length 1.4
  Top Layer w0.124: C40_R14.1@150.411,88.503 150.442,89.001 ANT1_R14.2@151.301,89.001
ANT_FEED_R21: ANT1_R21.2 C40_R21.1 Z41_R21.2 | length 1.4
  Top Layer w0.124: C40_R21.1@93.412,100.303 Z41_R21.2@93.442,100.8 ANT1_R21.2@94.301,100.801
ANT_FEED_R22: ANT1_R22.2 C40_R22.1 Z41_R22.2 | length 1.4
  Top Layer w0.124: C40_R22.1@112.412,100.303 112.442,100.801 ANT1_R22.2@113.301,100.801
ANT_FEED_R23: ANT1_R23.2 C40_R23.1 Z41_R23.2 | length 1.4
  Top Layer w0.124: C40_R23.1@131.412,100.303 Z41_R23.2@131.442,100.8 ANT1_R23.2@132.301,100.801
ANT_FEED_R24: ANT1_R24.2 C40_R24.1 Z41_R24.2 | length 1.4
  Top Layer w0.124: C40_R24.1@150.412,100.303 Z41_R24.2@150.442,100.8 ANT1_R24.2@151.301,100.801
ANT_FEED_R31: ANT1_R31.2 C40_R31.1 Z41_R31.2 | length 1.4
  Top Layer w0.124: C40_R31.1@93.411,112.103 Z41_R31.2@93.442,112.6 ANT1_R31.2@94.301,112.601
ANT_FEED_R32: ANT1_R32.2 C40_R32.1 Z41_R32.2 | length 1.4
  Top Layer w0.124: C40_R32.1@112.412,112.103 112.442,112.601 ANT1_R32.2@113.301,112.601
ANT_FEED_R33: ANT1_R33.2 C40_R33.1 Z41_R33.2 | length 1.4
  Top Layer w0.124: C40_R33.1@131.411,112.103 Z41_R33.2@131.442,112.6 ANT1_R33.2@132.301,112.601
ANT_FEED_R34: ANT1_R34.2 C40_R34.1 Z41_R34.2 | length 1.4
  Top Layer w0.124: C40_R34.1@150.411,112.103 Z41_R34.2@150.442,112.6 ANT1_R34.2@151.301,112.601
ANT_FEED_R41: ANT1_R41.2 C40_R41.1 Z41_R41.2 | length 1.4
  Top Layer w0.124: C40_R41.1@93.411,123.903 93.442,124.401 ANT1_R41.2@94.301,124.401
ANT_FEED_R42: ANT1_R42.2 C40_R42.1 Z41_R42.2 | length 1.4
  Top Layer w0.124: C40_R42.1@112.412,123.903 112.442,124.401 ANT1_R42.2@113.301,124.401
ANT_FEED_R43: ANT1_R43.2 C40_R43.1 Z41_R43.2 | length 1.4
  Top Layer w0.124: C40_R43.1@131.411,123.903 131.442,124.401 ANT1_R43.2@132.301,124.401
ANT_FEED_R44: ANT1_R44.2 C40_R44.1 Z41_R44.2 | length 1.4
  Top Layer w0.124: C40_R44.1@150.411,123.903 150.442,124.401 ANT1_R44.2@151.301,124.401
ANT_FEED_R51: ANT1_R51.2 C40_R51.1 Z41_R51.2 | length 1.4
  Top Layer w0.124: C40_R51.1@93.412,135.703 Z41_R51.2@93.442,136.2 ANT1_R51.2@94.301,136.201
ANT_FEED_R52: ANT1_R52.2 C40_R52.1 Z41_R52.2 | length 1.4
  Top Layer w0.124: C40_R52.1@112.412,135.703 112.442,136.201 ANT1_R52.2@113.301,136.201
ANT_FEED_R53: ANT1_R53.2 C40_R53.1 Z41_R53.2 | length 1.4
  Top Layer w0.124: C40_R53.1@131.412,135.703 Z41_R53.2@131.442,136.2 ANT1_R53.2@132.301,136.201
ANT_FEED_R54: ANT1_R54.2 C40_R54.1 Z41_R54.2 | length 1.4
  Top Layer w0.124: C40_R54.1@150.412,135.703 Z41_R54.2@150.442,136.2 ANT1_R54.2@151.301,136.201
ANT_NRF_R11: C3_R11.1 L3_R11.1 U1_R11.D1 | length 1.1
  Top Layer w0.124: U1_R11.D1@91.499,88.551 91.679,88.551 cw(c91.682,88.18) 91.865,88.503 ccw(c92.052,88.825) C3_R11.1@92.05,88.452 L3_R11.1@92.53,88.213
ANT_NRF_R12: C3_R12.1 L3_R12.1 U1_R12.D1 | length 1.1
  Top Layer w0.124: U1_R12.D1@110.499,88.551 110.678,88.551 cw(c110.681,88.18) 110.864,88.503 ccw(c111.052,88.825) C3_R12.1@111.049,88.452 ; C3_R12.1@111.05,88.452 L3_R12.1@111.53,88.213
ANT_NRF_R13: C3_R13.1 L3_R13.1 U1_R13.D1 | length 1.1
  Top Layer w0.124: U1_R13.D1@129.499,88.551 129.679,88.551 cw(c129.683,88.18) 129.866,88.503 ccw(c130.053,88.825) C3_R13.1@130.05,88.452 L3_R13.1@130.53,88.213
ANT_NRF_R14: C3_R14.1 L3_R14.1 U1_R14.D1 | length 1.1
  Top Layer w0.124: U1_R14.D1@148.499,88.551 148.679,88.551 cw(c148.682,88.18) 148.865,88.503 ccw(c149.053,88.825) C3_R14.1@149.05,88.452 L3_R14.1@149.53,88.213
ANT_NRF_R21: C3_R21.1 L3_R21.1 U1_R21.D1 | length 1.1
  Top Layer w0.124: U1_R21.D1@91.499,100.351 91.679,100.351 cw(c91.682,99.981) 91.865,100.304 ccw(c92.052,100.626) 92.05,100.253 L3_R21.1@92.53,100.013
ANT_NRF_R22: C3_R22.1 L3_R22.1 U1_R22.D1 | length 1.1
  Top Layer w0.124: U1_R22.D1@110.5,100.35 110.679,100.351 ; 110.678,100.352 cw(c110.681,99.981) 110.864,100.304 ccw(c111.052,100.626) C3_R22.1@111.049,100.253 ; C3_R22.1@111.05,100.252 L3_R22.1@111.53,100.013
ANT_NRF_R23: C3_R23.1 L3_R23.1 U1_R23.D1 | length 1.1
  Top Layer w0.124: U1_R23.D1@129.5,100.35 129.679,100.351 cw(c129.683,99.981) 129.866,100.304 ccw(c130.053,100.626) 130.051,100.253 L3_R23.1@130.53,100.013
ANT_NRF_R24: C3_R24.1 L3_R24.1 U1_R24.D1 | length 1.1
  Top Layer w0.124: U1_R24.D1@148.499,100.351 148.679,100.351 cw(c148.682,99.981) 148.865,100.304 ccw(c149.053,100.626) 149.05,100.253 L3_R24.1@149.53,100.013
ANT_NRF_R31: C3_R31.1 L3_R31.1 U1_R31.D1 | length 1.1
  Top Layer w0.124: U1_R31.D1@91.499,112.151 91.679,112.151 ; 91.679,112.15 cw(c91.682,111.779) 91.865,112.102 ccw(c92.052,112.424) C3_R31.1@92.05,112.052 ; C3_R31.1@92.05,112.052 L3_R31.1@92.53,111.813
ANT_NRF_R32: C3_R32.1 L3_R32.1 U1_R32.D1 | length 1.1
  Top Layer w0.124: U1_R32.D1@110.5,112.15 110.679,112.151 ; 110.678,112.15 cw(c110.681,111.779) 110.864,112.102 ccw(c111.052,112.424) C3_R32.1@111.049,112.051 ; C3_R32.1@111.05,112.052 L3_R32.1@111.53,111.813
ANT_NRF_R33: C3_R33.1 L3_R33.1 U1_R33.D1 | length 1.1
  Top Layer w0.124: U1_R33.D1@129.5,112.15 129.679,112.151 ; 129.68,112.15 cw(c129.683,111.779) 129.866,112.102 ccw(c130.053,112.424) C3_R33.1@130.05,112.052 ; C3_R33.1@130.05,112.052 L3_R33.1@130.53,111.813
ANT_NRF_R34: C3_R34.1 L3_R34.1 U1_R34.D1 | length 1.1
  Top Layer w0.124: U1_R34.D1@148.499,112.151 148.679,112.151 ; 148.679,112.15 cw(c148.682,111.779) 148.865,112.102 ccw(c149.053,112.424) C3_R34.1@149.05,112.052 ; C3_R34.1@149.05,112.052 L3_R34.1@149.53,111.813
ANT_NRF_R41: C3_R41.1 L3_R41.1 U1_R41.D1 | length 1.1
  Top Layer w0.124: U1_R41.D1@91.499,123.951 91.679,123.951 cw(c91.682,123.58) 91.865,123.903 ccw(c92.052,124.225) C3_R41.1@92.05,123.852 L3_R41.1@92.53,123.613
ANT_NRF_R42: C3_R42.1 L3_R42.1 U1_R42.D1 | length 1.1
  Top Layer w0.124: U1_R42.D1@110.499,123.951 110.679,123.951 ; 110.678,123.951 cw(c110.681,123.58) 110.864,123.903 ccw(c111.052,124.225) C3_R42.1@111.049,123.852 ; C3_R42.1@111.05,123.852 L3_R42.1@111.53,123.613
ANT_NRF_R43: C3_R43.1 L3_R43.1 U1_R43.D1 | length 1.1
  Top Layer w0.124: U1_R43.D1@129.499,123.951 129.679,123.951 cw(c129.683,123.58) 129.866,123.903 ccw(c130.053,124.225) C3_R43.1@130.05,123.852 L3_R43.1@130.53,123.613
ANT_NRF_R44: C3_R44.1 L3_R44.1 U1_R44.D1 | length 1.1
  Top Layer w0.124: U1_R44.D1@148.499,123.951 148.679,123.951 cw(c148.682,123.58) 148.865,123.903 ccw(c149.053,124.225) C3_R44.1@149.05,123.852 L3_R44.1@149.53,123.613
ANT_NRF_R51: C3_R51.1 L3_R51.1 U1_R51.D1 | length 1.1
  Top Layer w0.124: U1_R51.D1@91.499,135.751 91.679,135.751 cw(c91.682,135.381) 91.865,135.704 ccw(c92.052,136.026) 92.05,135.653 L3_R51.1@92.53,135.413
ANT_NRF_R52: C3_R52.1 L3_R52.1 U1_R52.D1 | length 1.1
  Top Layer w0.124: U1_R52.D1@110.5,135.75 110.679,135.751 ; 110.678,135.752 cw(c110.681,135.381) 110.864,135.704 ccw(c111.052,136.026) C3_R52.1@111.049,135.653 ; C3_R52.1@111.05,135.652 L3_R52.1@111.53,135.413
ANT_NRF_R53: C3_R53.1 L3_R53.1 U1_R53.D1 | length 1.1
  Top Layer w0.124: U1_R53.D1@129.5,135.75 129.679,135.751 cw(c129.683,135.381) 129.866,135.704 ccw(c130.053,136.026) 130.051,135.653 L3_R53.1@130.53,135.413
ANT_NRF_R54: C3_R54.1 L3_R54.1 U1_R54.D1 | length 1.1
  Top Layer w0.124: U1_R54.D1@148.499,135.751 148.679,135.751 cw(c148.682,135.381) 148.865,135.704 ccw(c149.053,136.026) 149.05,135.653 L3_R54.1@149.53,135.413
BQ_VDD_P11: C53_P11.1 U10_P11.D1 U10_P11.E1 | length 0.8
  Bottom Layer w0.15: C53_P11.1@85.051,86.1 85.051,86.499 U10_P11.D1@85.051,86.9
BQ_VDD_P12: C53_P12.1 U10_P12.D1 U10_P12.E1 | length 0.8
  Bottom Layer w0.15: C53_P12.1@104.051,86.1 U10_P12.E1@104.05,86.5 U10_P12.D1@104.05,86.9
BQ_VDD_P13: C53_P13.1 U10_P13.D1 U10_P13.E1 | length 0.8
  Bottom Layer w0.15: C53_P13.1@123.051,86.1 U10_P13.E1@123.05,86.5 U10_P13.D1@123.05,86.9
BQ_VDD_P14: C53_P14.1 U10_P14.D1 U10_P14.E1 | length 0.8
  Bottom Layer w0.15: C53_P14.1@142.051,86.1 142.051,86.499 U10_P14.D1@142.051,86.9
BQ_VDD_P21: C53_P21.1 U10_P21.D1 U10_P21.E1 | length 0.8
  Bottom Layer w0.15: C53_P21.1@85.051,97.9 85.051,98.299 U10_P21.D1@85.051,98.7
BQ_VDD_P22: C53_P22.1 U10_P22.D1 U10_P22.E1 | length 0.8
  Bottom Layer w0.15: C53_P22.1@104.051,97.9 104.051,98.299 U10_P22.D1@104.05,98.7
BQ_VDD_P23: C53_P23.1 U10_P23.D1 U10_P23.E1 | length 0.8
  Bottom Layer w0.15: C53_P23.1@123.051,97.9 123.051,98.299 U10_P23.D1@123.05,98.7
BQ_VDD_P24: C53_P24.1 U10_P24.D1 U10_P24.E1 | length 0.8
  Bottom Layer w0.15: C53_P24.1@142.051,97.9 142.051,98.299 U10_P24.D1@142.051,98.7
BQ_VDD_P31: C53_P31.1 U10_P31.D1 U10_P31.E1 | length 0.8
  Bottom Layer w0.15: C53_P31.1@85.051,109.7 85.051,110.099 U10_P31.D1@85.051,110.5
BQ_VDD_P32: C53_P32.1 U10_P32.D1 U10_P32.E1 | length 0.8
  Bottom Layer w0.15: C53_P32.1@104.051,109.7 104.051,110.101 U10_P32.D1@104.05,110.5
BQ_VDD_P33: C53_P33.1 U10_P33.D1 U10_P33.E1 | length 0.8
  Bottom Layer w0.15: C53_P33.1@123.051,109.7 U10_P33.E1@123.05,110.1 U10_P33.D1@123.05,110.5
BQ_VDD_P34: C53_P34.1 U10_P34.D1 U10_P34.E1 | length 0.8
  Bottom Layer w0.15: C53_P34.1@142.051,109.7 142.051,110.099 U10_P34.D1@142.051,110.5
BQ_VDD_P41: C53_P41.1 U10_P41.D1 U10_P41.E1 | length 0.8
  Bottom Layer w0.15: C53_P41.1@85.051,121.5 85.051,121.899 U10_P41.D1@85.051,122.3
BQ_VDD_P42: C53_P42.1 U10_P42.D1 U10_P42.E1 | length 0.8
  Bottom Layer w0.15: C53_P42.1@104.051,121.5 U10_P42.E1@104.05,121.9 U10_P42.D1@104.05,122.3
BQ_VDD_P43: C53_P43.1 U10_P43.D1 U10_P43.E1 | length 0.8
  Bottom Layer w0.15: C53_P43.1@123.051,121.5 U10_P43.E1@123.05,121.9 U10_P43.D1@123.05,122.3
BQ_VDD_P44: C53_P44.1 U10_P44.D1 U10_P44.E1 | length 0.8
  Bottom Layer w0.15: C53_P44.1@142.051,121.5 142.051,121.899 U10_P44.D1@142.051,122.3
BQ_VDD_P51: C53_P51.1 U10_P51.D1 U10_P51.E1 | length 0.8
  Bottom Layer w0.15: C53_P51.1@85.051,133.3 85.051,133.699 U10_P51.D1@85.051,134.1
BQ_VDD_P52: C53_P52.1 U10_P52.D1 U10_P52.E1 | length 0.8
  Bottom Layer w0.15: C53_P52.1@104.051,133.3 104.051,133.699 U10_P52.D1@104.05,134.1
BQ_VDD_P53: C53_P53.1 U10_P53.D1 U10_P53.E1 | length 0.8
  Bottom Layer w0.15: C53_P53.1@123.051,133.3 123.051,133.699 U10_P53.D1@123.05,134.1
BQ_VDD_P54: C53_P54.1 U10_P54.D1 U10_P54.E1 | length 0.8
  Bottom Layer w0.15: C53_P54.1@142.051,133.3 142.051,133.699 U10_P54.D1@142.051,134.1
CELL_N_P11: C55_P11.2 pad.BT2@86.058,90.4 U12_P11.2 U12_P11.3 | length 6.3
  Top Layer w0.3: pad.BT2@86.06,90.4 86.2,90.26 v4(86.3,90.26)
  Inner3 w0.15: v2(85.3,89.4) 84.75,89.4 84.75,90.7 85.226,90.7 86.3,90.7 v4(86.3,90.26)
  Inner3 w0.2: 85.226,90.7 v2(85.226,91.246)
  Bottom Layer w0.15: C55_P11.2@85.12,89.49 85.27,89.49 v2(85.3,89.4)
  Bottom Layer w0.2: v2(85.226,91.246) 85.226,91.47 86.176,91.47 U12_P11.3@86.176,91.246
CELL_N_P12: C55_P12.2 pad.BT2@105.06,90.4 U12_P12.2 U12_P12.3 | length 6.3
  Top Layer w0.3: pad.BT2@105.06,90.4 105.2,90.26 v4(105.3,90.26)
  Inner3 w0.15: v2(104.3,89.4) 103.75,89.4 103.75,90.7 104.226,90.7 105.3,90.7 v4(105.3,90.26)
  Inner3 w0.2: 104.226,90.7 v2(104.226,91.246)
  Bottom Layer w0.15: C55_P12.2@104.12,89.49 104.27,89.49 v2(104.3,89.4)
  Bottom Layer w0.2: v2(104.226,91.246) 104.226,91.47 105.176,91.47 U12_P12.3@105.176,91.246
CELL_N_P13: C55_P13.2 pad.BT2@124.059,90.4 U12_P13.2 U12_P13.3 | length 6.3
  Top Layer w0.3: pad.BT2@124.059,90.4 124.2,90.26 v4(124.3,90.26)
  Inner3 w0.15: v2(123.3,89.4) 122.75,89.4 122.75,90.7 123.226,90.7 124.3,90.7 v4(124.3,90.26)
  Inner3 w0.2: 123.226,90.7 v2(123.226,91.246)
  Bottom Layer w0.15: C55_P13.2@123.12,89.49 123.27,89.49 v2(123.3,89.4)
  Bottom Layer w0.2: v2(123.226,91.246) 123.226,91.47 124.176,91.47 U12_P13.3@124.176,91.246
CELL_N_P14: C55_P14.2 pad.BT2@143.058,90.4 U12_P14.2 U12_P14.3 | length 6.3
  Top Layer w0.3: pad.BT2@143.06,90.4 143.2,90.26 v4(143.3,90.26)
  Inner3 w0.15: v2(142.3,89.4) 141.75,89.4 141.75,90.7 142.226,90.7 143.3,90.7 v4(143.3,90.26)
  Inner3 w0.2: 142.226,90.7 v2(142.226,91.246)
  Bottom Layer w0.15: C55_P14.2@142.12,89.49 142.27,89.49 v2(142.3,89.4)
  Bottom Layer w0.2: v2(142.226,91.246) 142.226,91.47 143.176,91.47 U12_P14.3@143.176,91.246
CELL_N_P21: C55_P21.2 pad.BT2@86.058,102.201 U12_P21.2 U12_P21.3 | length 6.3
  Top Layer w0.3: pad.BT2@86.06,102.2 86.2,102.06 v4(86.3,102.06)
  Inner3 w0.15: v2(85.3,101.2) 84.75,101.2 84.75,102.5 85.226,102.5 86.3,102.5 v4(86.3,102.06)
  Inner3 w0.2: 85.226,102.5 v2(85.226,103.046)
  Bottom Layer w0.15: C55_P21.2@85.12,101.291 85.27,101.29 v2(85.3,101.2)
  Bottom Layer w0.2: v2(85.226,103.046) 85.226,103.27 86.176,103.27 U12_P21.3@86.176,103.046
CELL_N_P22: C55_P22.2 pad.BT2@105.06,102.201 U12_P22.2 U12_P22.3 | length 6.3
  Top Layer w0.3: pad.BT2@105.06,102.2 105.2,102.06 v4(105.3,102.06)
  Inner3 w0.15: v2(104.3,101.2) 103.75,101.2 103.75,102.5 104.226,102.5 105.3,102.5 v4(105.3,102.06)
  Inner3 w0.2: 104.226,102.5 v2(104.226,103.046)
  Bottom Layer w0.15: C55_P22.2@104.12,101.291 104.27,101.29 v2(104.3,101.2)
  Bottom Layer w0.2: v2(104.226,103.046) 104.226,103.27 105.176,103.27 U12_P22.3@105.176,103.046
CELL_N_P23: C55_P23.2 pad.BT2@124.059,102.201 U12_P23.2 U12_P23.3 | length 6.3
  Top Layer w0.3: pad.BT2@124.06,102.2 124.2,102.06 v4(124.3,102.06)
  Inner3 w0.15: v2(123.3,101.2) 122.75,101.2 122.75,102.5 123.226,102.5 124.3,102.5 v4(124.3,102.06)
  Inner3 w0.2: 123.226,102.5 v2(123.226,103.046)
  Bottom Layer w0.15: C55_P23.2@123.12,101.291 123.27,101.29 v2(123.3,101.2)
  Bottom Layer w0.2: v2(123.226,103.046) 123.226,103.27 124.176,103.27 U12_P23.3@124.176,103.046
CELL_N_P24: C55_P24.2 pad.BT2@143.058,102.201 U12_P24.2 U12_P24.3 | length 6.3
  Top Layer w0.3: pad.BT2@143.06,102.2 143.2,102.06 v4(143.3,102.06)
  Inner3 w0.15: v2(142.3,101.2) 141.75,101.2 141.75,102.5 142.226,102.5 143.3,102.5 v4(143.3,102.06)
  Inner3 w0.2: 142.226,102.5 v2(142.226,103.046)
  Bottom Layer w0.15: C55_P24.2@142.12,101.291 142.27,101.29 v2(142.3,101.2)
  Bottom Layer w0.2: v2(142.226,103.046) 142.226,103.27 143.176,103.27 U12_P24.3@143.176,103.046
CELL_N_P31: C55_P31.2 pad.BT2@86.058,113.999 U12_P31.2 U12_P31.3 | length 6.3
  Top Layer w0.3: pad.BT2@86.06,114 86.2,113.86 v4(86.3,113.86)
  Inner3 w0.15: v2(85.3,113) 84.75,113 84.75,114.3 85.226,114.3 86.3,114.3 v4(86.3,113.86)
  Inner3 w0.2: 85.226,114.3 v2(85.226,114.846)
  Bottom Layer w0.15: C55_P31.2@85.12,113.091 85.27,113.09 v2(85.3,113)
  Bottom Layer w0.2: v2(85.226,114.846) 85.226,115.07 86.176,115.07 U12_P31.3@86.176,114.846
CELL_N_P32: C55_P32.2 pad.BT2@105.06,113.999 U12_P32.2 U12_P32.3 | length 6.3
  Top Layer w0.3: pad.BT2@105.06,113.999 105.2,113.86 v4(105.3,113.86)
  Inner3 w0.15: v2(104.3,113) 103.75,113 103.75,114.3 104.226,114.3 105.3,114.3 v4(105.3,113.86)
  Inner3 w0.2: 104.226,114.3 v2(104.226,114.846)
  Bottom Layer w0.15: C55_P32.2@104.12,113.091 104.27,113.09 v2(104.3,113)
  Bottom Layer w0.2: v2(104.226,114.846) 104.226,115.07 105.176,115.07 U12_P32.3@105.176,114.846
CELL_N_P33: C55_P33.2 pad.BT2@124.059,113.999 U12_P33.2 U12_P33.3 | length 6.3
  Top Layer w0.3: pad.BT2@124.059,113.999 124.2,113.86 v4(124.3,113.86)
  Inner3 w0.15: v2(123.3,113) 122.75,113 122.75,114.3 123.226,114.3 124.3,114.3 v4(124.3,113.86)
  Inner3 w0.2: 123.226,114.3 v2(123.226,114.846)
  Bottom Layer w0.15: C55_P33.2@123.12,113.091 123.27,113.09 v2(123.3,113)
  Bottom Layer w0.2: v2(123.226,114.846) 123.226,115.07 124.176,115.07 U12_P33.3@124.176,114.846
CELL_N_P34: C55_P34.2 pad.BT2@143.058,113.999 U12_P34.2 U12_P34.3 | length 6.3
  Top Layer w0.3: pad.BT2@143.06,114 143.2,113.86 v4(143.3,113.86)
  Inner3 w0.15: v2(142.3,113) 141.75,113 141.75,114.3 142.226,114.3 143.3,114.3 v4(143.3,113.86)
  Inner3 w0.2: 142.226,114.3 v2(142.226,114.846)
  Bottom Layer w0.15: C55_P34.2@142.12,113.091 142.27,113.09 v2(142.3,113)
  Bottom Layer w0.2: v2(142.226,114.846) 142.226,115.07 143.176,115.07 U12_P34.3@143.176,114.846
CELL_N_P41: C55_P41.2 pad.BT2@86.058,125.8 U12_P41.2 U12_P41.3 | length 6.3
  Top Layer w0.3: pad.BT2@86.06,125.8 86.2,125.66 v4(86.3,125.66)
  Inner3 w0.15: v2(85.3,124.8) 84.75,124.8 84.75,126.1 85.226,126.1 86.3,126.1 v4(86.3,125.66)
  Inner3 w0.2: 85.226,126.1 v2(85.226,126.646)
  Bottom Layer w0.15: C55_P41.2@85.12,124.89 85.27,124.89 v2(85.3,124.8)
  Bottom Layer w0.2: v2(85.226,126.646) 85.226,126.87 86.176,126.87 U12_P41.3@86.176,126.646
CELL_N_P42: C55_P42.2 pad.BT2@105.06,125.8 U12_P42.2 U12_P42.3 | length 6.3
  Top Layer w0.3: pad.BT2@105.06,125.8 105.2,125.66 v4(105.3,125.66)
  Inner3 w0.15: v2(104.3,124.8) 103.75,124.8 103.75,126.1 104.226,126.1 105.3,126.1 v4(105.3,125.66)
  Inner3 w0.2: 104.226,126.1 v2(104.226,126.646)
  Bottom Layer w0.15: C55_P42.2@104.12,124.89 104.27,124.89 v2(104.3,124.8)
  Bottom Layer w0.2: v2(104.226,126.646) 104.226,126.87 105.176,126.87 U12_P42.3@105.176,126.646